# Altium PCB PCB-Powermodule-v11.0.0.PcbDoc (part 4 of 5)
Units mil, origin at the board's own origin, x right, y up, seen from the top; angles counter-clockwise.
Board outline 3031.5 x 1495.87 mil, 4 copper layers (Top Layer, Ground, Power, Bottom Layer), stack 61.653 mil thick; 227 components, 160 nets, 893 pads, 326 vias.
Unrouted connection lines stored in the file: 45.
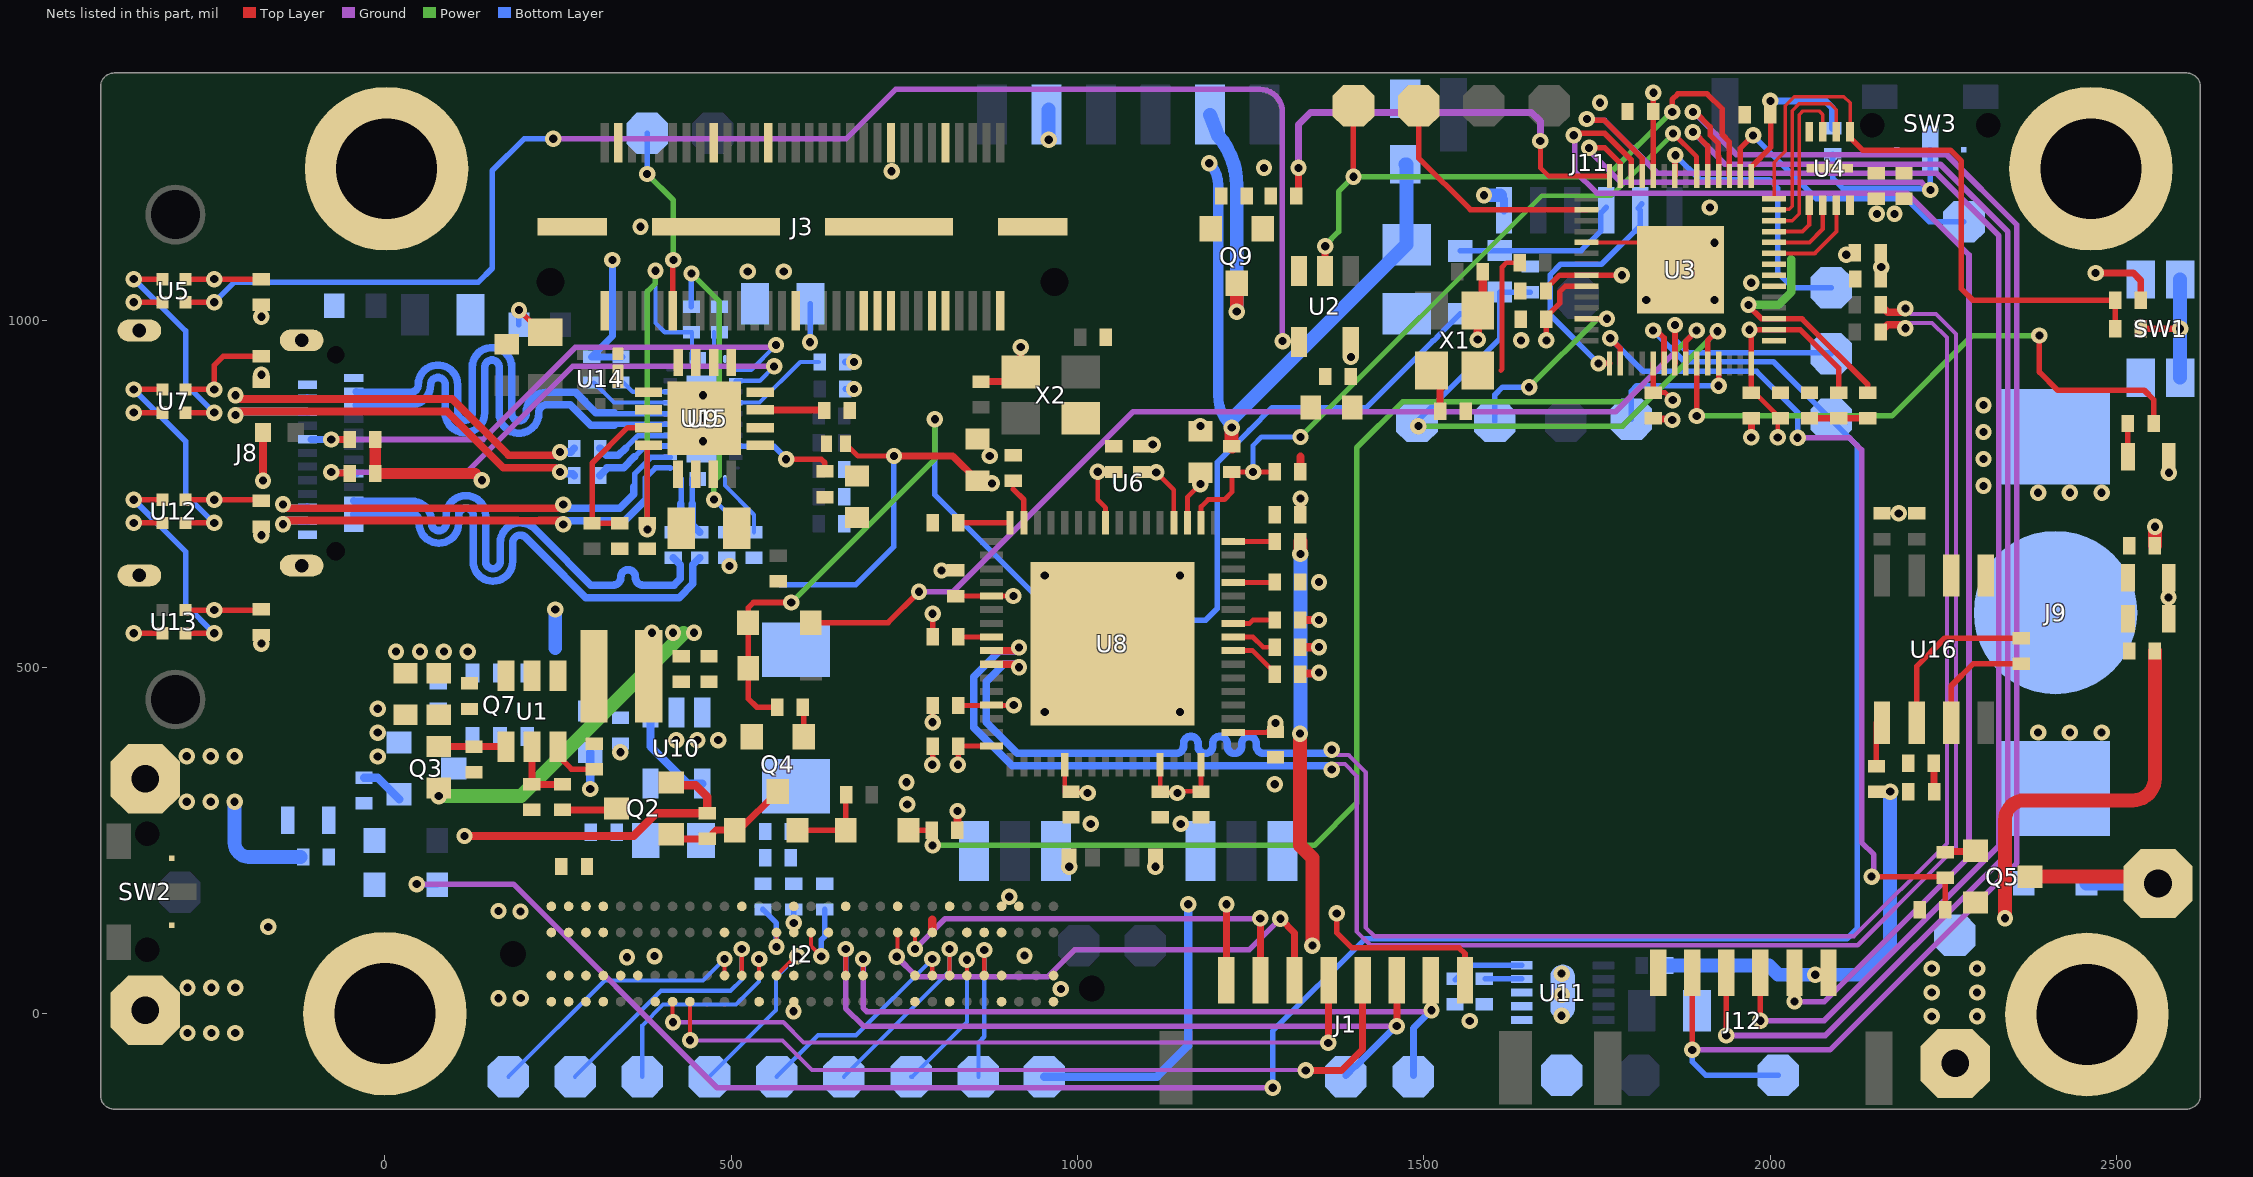
[diagram p4: the nets of this part, all layers, seen from the top]

## Via types
v1: diameter 23.62, hole 11.81, Top Layer to Bottom Layer, tented both sides, 326 vias

## Nets (pads, with @x,y where several pads share a name; then routed paths per layer and width w, separated by ;. In a path a pad name is that pad's centre, name@x,y a point inside that pad or via, vN(x,y) a via of type N, cw(c..) or ccw(c..) an arc to the next point about the centre after c; other vN are vias at no path point) (continued)
+3V3: (continued)
  Power w20: v1(77.66,314.05) 77.66,314.35 196.5,314.35 430.86,548.7 430.86,549.96
  Bottom Layer w8: 570.64,619.36 680,619.36 734.94,674.29 v1(734.94,805.08)
  Bottom Layer w10: v1(2000.27,1317.74) 2080.01,1317.74 2090.08,1307.67 R34.1@2090.08,1277.98
  Bottom Layer w12: U10.1@383.49,434.48 383.49,385.63 437,332.12 U10.4@458.3,332.12 ; P7.1@951.85,-91 1115,-91 1159.77,-46.23 v1(1159.77,157.93)
  Bottom Layer w15: v1(1190.2,1227.78) cw(c1159.65,1197.23) 1202.86,1197.23 1202.86,893.55 ccw(c1269.93,893.55) v1(1222.5,846.12)
  Bottom Layer w20: v1(1222.5,846.12) 1222.5,857.65 C36.2@1475.05,1110.2 1475.05,1226.26 C35.1@1473.1,1226.26 ; R70.1@1851.43,69.45 1998.12,69.45 2011.34,56.24 v1(2065,56.24) 2129.24,56.24 2173.2,100.2 v1(2173.2,320.58)
  other v1: 827.28,359.37 385.44,549.96 415.86,549.96 446.27,549.96 2185.6,722.21 876.3,765.53 2010.89,831.99 1972.7,1055.17 2154.05,1154.65 2179.48,1154.65
+5V: C57.1 C65.2 C67.1 D8.1 J2.A01 J2.A02 J2.B01 J2.B02 J2.C01 J2.C02 J2.D01 J2.D02 P2.1 P14.1 Q7.1 Q7.2 Q7.5 Q7.6 R1.2 R27.2 R28.2 R46.2 R49.1 R52.1 R57.1 R60.1 R61.1 R66.2 R69.1 U9.30 U11.2 U11.3 U15.1 U15.2 U15.3 | length 1638.4
  Top Layer w16: R27.2@-13.97,828.92 R28.2@-13.97,779.7 130.43,779.7 v1(140,770.13)
  Top Layer w20: v1(1321.19,404.32) 1321.19,242.81 1339.03,224.98 v1(1339.03,98.16) ; v1(1321.69,663.59) R52.1@1321.69,681.62 ; v1(2339.07,137.86) 2339.07,279.73 cw(c2367.3,279.73) 2367.3,307.96 2523.46,307.96 ccw(c2523.46,340) 2555.49,340 R1.2@2555.49,523.46
  Bottom Layer w10: v1(328.41,1088.02) 328.41,978.07 R60.1@298.56,948.22 R49.1@340.91,948.22 R49.1@342.58,948.22 ; R57.1@664.8,940.75 v1(677.3,940.75)
  Bottom Layer w20: 245.83,528.14 v1(245.83,583.52) ; v1(1321.19,404.32) 1321.69,404.83 v1(1321.69,663.59)
  other v1: 1566.13,-10.65 2233.15,-3.94 2298.66,-3.94 164,22.15 196.13,22.43 2233.15,30.58 2298.66,30.58 2233.15,65.09 2298.66,65.09 164,148.15 195.72,147.46 523.94,1071.54 575.85,1071.54
+5V_ESC: C3.2 C4.2 C5.2 C13.2 C14.2 C39.1 C40.1 C41.1 C42.1 P1.1 Q2.2 Q7.4 R2.2 R7.2 R11.1 U1.3 U2.5 U5.2 U7.2 U12.2 U13.2 | length 1091.2
  Top Layer w8: U13.2@-287.8,582.68 v1(-246.49,582.68) -184.82,582.68 C42.1@-181.08,586.41 ; U12.2@-287.8,741.93 v1(-246.49,741.93) -179.99,741.93 C41.1@-178.35,740.29 ; U7.2@-287.8,901.18 v1(-246.49,901.18) -246.49,936 -233.49,949 C40.1@-178.35,949 ; U5.2@-287.8,1060.44 v1(-246.49,1060.44) C39.1@-178.35,1060.44
  Top Layer w12: C42.1@-181.08,586.41 C42.1@-180.35,585.68 ; v1(115,256.55) 359.15,256.55 391.97,289.37 R11.1@465.44,289.37 465.44,313.01 448.79,329.66 Q2.2@413.35,329.66
  Bottom Layer w20: v1(-216.98,306) -216.98,246.79 ccw(c-196.43,246.79) -196.43,226.24 R7.2@-121.93,226.24
  other v1: -286,306 -251.49,306 -286,371.51 -251.49,371.51 -216.98,371.51 16.06,522.66 50.58,522.66 85.09,522.66 119.6,522.66 1394.6,948.17
"A8_I2C_2 SDA": J1.4 J2.A08 | length 1078.2
  Top Layer w5: v1@415.28,-11.64 v1(415.97,-12.33)
  Top Layer w6: v1@415.28,-11.64 J2.A08@415.28,17.19
  Top Layer w10: v1@1362.49,-41.75 J1.4@1362.49,47.97
  Ground w6: v1(415.97,-12.33) 575.1,-12.33 604.52,-41.75 v1@1362.49,-41.75
  other v1: 1361.99,-42.25
"A9_I2C_2 SCL": J1.5 J2.A09 | length 1156.8
  Top Layer w6: J2.A09@440.28,17.19 440.43,17.04 440.43,-38.39 v1(440.58,-38.54)
  Top Layer w10: v1(1329.5,-81.95) 1381.19,-81.95 1411.39,-51.75 1411.39,47.65 J1.5@1411.7,47.97
  Ground w6: v1(440.58,-38.54) 440.88,-38.84 573.84,-38.84 616.45,-81.45 v1@1329.5,-81.45
ADC_AVDD: C31.2 R17.1 U3.43
B11_GPIO_155: J2.B11 P19.1 | length 406.1
  Top Layer w6: J2.B11@490.28,54.99 v1(490.28,78.81)
  Bottom Layer w6: P19.1@178.35,-91 317.36,48.01 459.48,48.01 v1(490.28,78.81)
B12_GPIO_154: J2.B12 P27.1 | length 384.4
  Top Layer w6: J2.B12@515.28,54.99 v1(515.28,93.38) v1@515.28,96.38
  Bottom Layer w6: P27.1@274.52,-91 398.52,33 499.15,33 515.28,49.13 v1(515.28,93.38)
B13_GPIO_153: J2.B13 P28.1 | length 325.2
  Top Layer w6: J2.B13@540.28,54.99 v1(540.28,78.81)
  Bottom Layer w6: P28.1@371.62,-91 371.62,-16.96 401.62,13.04 507.04,13.04 540.28,46.28 v1(540.28,78.81)
B14_GPIO_152: J2.B14 P29.1 | length 267.6
  Top Layer w6: J2.B14@565.28,54.99 593.01,82.73 v1(595.23,82.73)
  Bottom Layer w6: P29.1@468.66,-91 564.64,4.98 564.64,52.13 v1(595.23,82.73)
"B18_UART13 RX": J1.6 J2.B18 P34.1 | length 1097.9
  Top Layer w6: J2.B18@665.28,54.99 v1(665.28,93.38)
  Top Layer w10: v1@1459.91,-18.03 1460.91,-17.03 J1.6@1460.91,47.97
  Ground w8: v1(665.28,93.38) 665.28,7.72 691.03,-18.03 v1@1459.91,-18.03
  Bottom Layer w10: P34.1@1387.18,-89.09 1400.47,-75.81 1402.13,-75.81 v1@1459.91,-18.03
  other v1: 1460.91,-18.03
"B19_UART13 TX": J1.7 J2.B19 P35.1 | length 1066.5
  Top Layer w6: J2.B19@690.28,54.99 v1(690.28,78.81)
  Top Layer w10: J1.7@1510.13,47.97 1510.13,5.87 v1(1511,5)
  Ground w8: v1(690.28,78.81) 690.28,8.32 695.81,2.78 1508.78,2.78 v1(1511,5)
  Bottom Layer w10: P35.1@1484.96,-89.09 1484.96,-21.04 v1(1511,5)
B23_MISO: J2.B23 P36.1 | length 318.7
  Top Layer w6: J2.B23@790.28,54.99 v1(790.28,78.81)
  Bottom Layer w6: P36.1@565.71,-91 625.51,-31.2 680.27,-31.2 v1(790.28,78.81)
B24_MOSI: J2.B24 P37.1 | length 285.9
  Top Layer w6: J2.B24@815.28,54.99 v1(815.28,93.38)
  Bottom Layer w6: P37.1@662.75,-91 815.28,61.52 v1(815.28,93.38)
B25_SCLK: J2.B25 P38.1 | length 227
  Top Layer w6: v1@840.17,78.75 840.17,55.1 J2.B25@840.28,54.99
  Bottom Layer w6: P38.1@759.8,-91 761.61,-91 840.28,-12.33 v1(840.28,77.81)
B26_CS_N: J2.B26 P39.1 | length 223.1
  Top Layer w6: J2.B26@865.28,54.99 v1(865.28,91.8)
  Bottom Layer w6: P39.1@856.85,-91 856.85,-41.75 865.28,-33.32 v1(865.28,91.8)
BOOTSEL_MCU: J3.17
C21_GPIO_86: J1.3 J2.C21 | length 734
  Top Layer w6: v1(738.95,82.16) 739.71,82.16 740.28,82.73 J2.C21@740.28,117.19
  Top Layer w10: v1(1292.78,137.12) 1313.28,116.62 J1.3@1313.28,47.97
  Ground w8: v1(738.95,82.16) 767.58,53.53 957.1,53.53 996.12,92.55 1248.21,92.55 v1(1292.78,137.12)
C22_GPIO_85: J1.2 J2.C22 | length 630.2
  Top Layer w6: v1(765.28,93.38) J2.C22@765.28,117.19
  Top Layer w10: v1(1263.71,137.48) 1263.88,137.3 1263.88,48.15 J1.2@1264.06,47.97
  Ground w8: v1(765.28,93.38) 784.51,112.61 809.02,137.12 1263.35,137.12 v1(1263.71,137.48)
CC1: J8.A5 R28.1 U9.2 | length 830.9
  Top Layer w10: v1(-77.42,781.78) -76.38,780.74 -52.01,780.74 R28.1@-50.97,779.7
  Ground w8: v1(-77.42,781.78) 118.35,781.78 271.04,934.47 v1(561.92,934.47)
  Bottom Layer w6: U9.2@506.54,913.66 541.11,913.66 v1(561.92,934.47)
  Bottom Layer w10: v1(-77.42,781.78) -76.51,780.88 -42.47,780.88 J8.A5@-41.29,779.7
CC2: J8.B5 R27.1 U9.1 | length 828.9
  Top Layer w10: v1(-77.34,828.92) R27.1@-50.97,828.92
  Ground w8: v1(-77.34,828.92) 141.91,828.92 275.07,962.08 564.26,962.08 564.67,962.48 v1(564.67,965.42)
  Bottom Layer w6: U9.1@506.54,929.41 528.84,929.41 564.67,965.23 v1(564.67,965.42)
  Bottom Layer w10: J8.B5@-106.41,828.92 v1(-77.34,828.92)
CH_EN: D10.2 J11.4 R36.2 | length 252
  Bottom Layer w8: D10.2@1552.33,1101.7 R36.2@1609.66,1101.7 1727.03,1101.7 1755.5,1130.16 1755.5,1156.21 J11.4@1763.31,1164.02
CH_EN_3V3: D5.1 D7.1 D10.1 R13.2 | length 1843.2
  Top Layer w8: R13.2@566.17,442.44 536.84,442.44 524.34,454.94 D7.1@524.34,564.57 524.34,585.76 532.14,593.57 v1@586.74,593.57
  Power w8: v1(586.74,593.64) 793.97,800.87 v1(793.97,858.1)
  Bottom Layer w8: v1(793.97,858.1) 793.97,749.03 974.74,568.26 1185.1,568.26 1201.69,584.85 1201.69,795.88 1248,842.19 1280.79,874.98 1416.93,874.98 1513.15,971.2 1513.78,971.2 1519.05,976.47 1519.05,977.1 D10.1@1552.33,1010.38
CRX1_N: J8.B10 U9.17 | length 650.5
  Top Layer w11: v1(-147.08,735.23) -141.77,729.92 198.92,729.92 199.2,729.65 252.18,729.65 v1(257.5,734.96)
  Bottom Layer w8: 359.5,760.58 361,762.08 361,779.63 384.41,803.04 411.68,803.04 U9.17@412.06,803.42
  Bottom Layer w11: v1(-147.08,735.23) -141.77,729.92 -112.77,729.92 J8.B10@-111.93,730.76 ; v1(257.5,734.96) 262.81,729.65 312.35,729.65 339.07,729.65 359.5,750.07 359.5,760.58
CRX1_P: J8.B11 U9.16 | length 655.7
  Top Layer w11: v1(-147.08,706.61) -141.77,711.92 191.47,711.92 191.74,711.65 222.7,711.65 222.97,711.92 251.91,711.92 v1(257.5,706.34)
  Bottom Layer w8: 377.5,760.58 376,762.08 376,773.41 390.63,788.04 411.68,788.04 U9.16@412.06,787.67
  Bottom Layer w11: v1(-147.08,706.61) -141.77,711.92 -112.77,711.92 J8.B11@-111.93,711.08 ; v1(257.5,706.34) 262.81,711.65 312.35,711.65 346.52,711.65 377.5,742.62 377.5,760.58
CRX2_N: J8.A10 U9.20 | length 752.7
  Bottom Layer w8: 330.7,849.54 332.2,851.04 411.69,851.04 U9.20@412.06,850.67
  Bottom Layer w11: J8.A10@-41.29,878.13 -40.45,878.97 -17.5,878.97 37.07,878.97 ccw(c37.07,907.97) 66.07,907.97 cw(c76.57,907.97) 87.07,907.97 87.07,867.41 ccw(c115.57,867.41) 144.07,867.41 144.07,933.14 cw(c154.57,933.14) 165.07,933.14 165.07,866.61 ccw(c193.57,866.61) 222.07,866.61 222.07,867.97 cw(c233.07,867.97) 233.07,878.97 247.57,878.97 267.72,878.97 297.15,849.54 330.7,849.54
CRX2_P: J8.A11 U9.21 | length 752.7
  Bottom Layer w8: 330.7,867.54 332.2,866.04 411.69,866.04 U9.21@412.06,866.41
  Bottom Layer w11: J8.A11@-41.29,897.81 -40.45,896.97 -17.5,896.97 37.07,896.97 ccw(c37.07,907.97) 48.07,907.97 cw(c76.57,907.97) 105.07,907.97 105.07,867.41 ccw(c115.57,867.41) 126.07,867.41 126.07,933.14 cw(c154.57,933.14) 183.07,933.14 183.07,866.61 ccw(c193.57,866.61) 204.07,866.61 204.07,867.97 cw(c233.07,867.97) 233.07,896.97 247.57,896.97 275.17,896.97 304.6,867.54 330.7,867.54
CTX1_N: C17.1 J8.A3 | length 769.1
  Bottom Layer w11: J8.A3@-45,740.61 -44.16,739.76 -8.4,739.76 38.42,739.76 cw(c38.42,710.76) 67.42,710.76 67.42,707.86 ccw(c77.92,707.86) 77.92,697.36 ccw(c77.92,707.86) 88.42,707.86 88.42,719.32 cw(c116.92,719.32) 116.92,747.82 cw(c116.92,719.32) 145.42,719.32 145.42,652.92 ccw(c155.92,652.92) 155.92,642.42 ccw(c155.92,652.92) 166.42,652.92 166.42,679.68 cw(c195.42,679.68) 212.9,702.82 213.29,702.82 229.92,686.19 297.4,618.71 324.14,618.71 329.64,618.71 ccw(c329.64,629.71) 340.64,629.71 340.64,630.4 cw(c351.14,630.4) 361.64,630.4 361.64,629.71 ccw(c372.64,629.71) 372.64,618.71 389.16,618.71 417.32,618.71 426.48,627.88 426.48,648.01 C17.1@416.48,658.01
CTX1_P: C9.1 J8.A2 | length 773.7
  Bottom Layer w11: J8.A2@-45,720.92 -44.16,721.76 -8.4,721.76 38.42,721.76 cw(c38.42,710.76) 49.42,710.76 49.42,707.86 ccw(c77.92,707.86) 77.92,679.36 ccw(c77.92,707.86) 106.42,707.86 106.42,719.32 cw(c116.92,719.32) 116.92,729.82 cw(c116.92,719.32) 127.42,719.32 127.42,652.92 ccw(c155.92,652.92) 155.92,624.42 ccw(c155.92,652.92) 184.42,652.92 184.42,679.68 cw(c195.42,679.68) 203.23,687.43 ; 203.24,687.42 229.92,660.74 289.95,600.71 424.77,600.71 444.48,620.42 444.48,648.01 C9.1@454.48,658.01
CTX1C_N: C17.2 U9.15 | length 81.6
  Bottom Layer w8: 426.98,735.85 427.8,736.66 U9.15@427.8,771.92
  Bottom Layer w11: C17.2@416.48,695.01 426.98,705.51 426.98,735.85
CTX1C_P: C9.2 U9.14 | length 81.4
  Bottom Layer w8: U9.14@443.55,771.93 443.55,736.29 443.98,735.85
  Bottom Layer w11: 443.98,735.85 443.98,705.51 C9.2@454.48,695.01
CTX2_N: C8.2 J8.B3 | length 636
  Top Layer w11: v1(-215.67,864.09) -210.36,869.4 89.59,869.4 171.02,787.98 246.92,787.98 v1(252.85,782.05)
  Bottom Layer w11: v1(-215.67,864.09) -210.36,869.4 -112.77,869.4 J8.B3@-111.93,868.56 ; v1(252.85,782.05) 255.26,779.63 270.9,779.63 C8.2@273.56,776.98
CTX2_P: C7.2 J8.B2 | length 635.6
  Top Layer w11: v1(-215.67,892.71) -210.36,887.4 87.88,887.4 97.05,887.4 178.47,805.98 248.01,805.98 v1(252.7,810.67)
  Bottom Layer w11: v1(-215.67,892.71) -210.36,887.4 -112.77,887.4 J8.B2@-111.93,888.24 ; v1(252.7,810.67) 252.85,810.82 268.34,810.82 C7.2@273.56,816.03
CTX2C_N: C8.1 U9.18 | length 120.3
  Bottom Layer w8: 360.27,803.82 376,819.54 411.68,819.54 U9.18@412.06,819.17
  Bottom Layer w11: C8.1@310.56,776.98 321.67,788.1 ; 320.67,788.1 321.67,788.1 ; 360.27,803.82 344.55,788.1 321.67,788.1
CTX2C_P: C7.1 U9.19 | length 118.6
  Bottom Layer w8: 347.54,816.55 365.54,834.54 411.68,834.54 U9.19@412.06,834.92
  Bottom Layer w11: C7.1@310.56,816.03 320.5,806.1 ; C7.1@319.5,806.1 320.5,806.1 ; 347.54,816.55 337.09,806.1 320.5,806.1
D_N: R18.2 U8.10 | length 2812.2
  Top Layer w11: U8.10@875.77,504.45 912.84,504.45 917.31,499.98 v1(915.46,499.98) ; R18.2@2159.33,984.24 2169.83,994.74 2189.84,994.74 v1(2195.16,989.43)
  Ground w6: v1(1367,380.99) 1367,373.18 1391.44,373.18 1416,348.61 1416,124.13 1428.33,111.81 2121.01,111.81 2255,245.8 2255,976 2233.76,997.24 2202.97,997.24 v1(2195.16,989.43)
  Bottom Layer w11: v1(915.46,499.98) 910.15,505.29 894.31,505.29 867.99,478.98 867.99,420.59 912.9,375.68 1112.34,375.68 1142.07,375.68 ccw(c1142.07,386.68) 1153.07,386.68 1153.07,389.71 cw(c1163.57,389.71) 1174.07,389.71 1174.07,386.18 ccw(c1184.57,386.18) 1195.07,386.18 1195.07,389.71 cw(c1205.57,389.71) 1216.07,389.71 1216.07,386.18 ccw(c1226.57,386.18) 1237.07,386.18 1237.07,389.71 cw(c1247.57,389.71) 1258.07,389.71 1258.07,386.68 ccw(c1269.07,386.68) 1269.07,375.68 1295.57,375.68 1348.51,375.68 1361.69,375.68 v1(1367,380.99)
D_P: R20.2 U8.9 | length 2822.3
  Top Layer w11: U8.9@875.77,524.14 912.84,524.14 917.31,528.6 v1(915.46,528.6) ; R20.2@2159.33,1023.24 2169.83,1012.74 2189.84,1012.74 v1(2195.16,1018.05)
  Ground w6: v1(1367,352.37) 1367,360.18 1386.05,360.18 1403,343.23 1403,118.75 1422.94,98.81 1753.83,98.81 2126.39,98.81 2236.96,209.37 2268,240.41 2268,981.38 2239.14,1010.24 2202.97,1010.24 v1(2195.16,1018.05)
  Bottom Layer w11: v1(915.46,528.6) 910.15,523.29 886.85,523.29 849.99,486.43 849.99,413.14 905.45,357.68 1348.51,357.68 1361.69,357.68 v1(1367,352.37)
DIN#: U2.4 U5.4 | length 2142.9
  Top Layer w8: U5.4@-287.8,1026.97 v1(-246.49,1026.97)
  Ground w8: v1(243,1263) 665.94,1263 737.32,1334.37 1263.19,1334.37 cw(c1263.19,1301.78) 1295.79,1301.78 1295.79,971.21 v1(1296,971)
  Bottom Layer w8: v1(-246.49,1026.97) -217.29,1056.17 135,1056.17 155,1076.17 155,1217 201,1263 v1(243,1263)
DOUT1: U5.1 U7.4 | length 323.4
  Top Layer w8: v1(-362.57,1060.44) U5.1@-321.26,1060.44 ; U7.4@-287.8,867.72 v1(-246.49,867.72)
  Bottom Layer w8: v1(-362.57,1060.44) -287.8,985.67 -287.8,909.03 v1(-246.49,867.72)
DOUT2: U7.1 U12.4 | length 323.4
  Top Layer w8: v1(-362.57,901.18) U7.1@-321.26,901.18 ; U12.4@-287.8,708.47 v1(-246.49,708.47)
  Bottom Layer w8: v1(-362.57,901.18) -287.8,826.41 -287.8,749.77 v1(-246.49,708.47)
DOUT3: U12.1 U13.4 | length 323.4
  Top Layer w8: v1(-362.57,741.93) U12.1@-321.26,741.93 ; U13.4@-287.8,549.21 v1(-246.49,549.21)
  Bottom Layer w8: v1(-362.57,741.93) -287.8,667.16 -287.8,590.52 v1(-246.49,549.21)
EN_3V3_BUCK: Q2.3 R5.1 | length 79.1
  Top Layer w10: R5.1@256.27,294.08 332.79,294.08 Q2.3@334.6,292.26
EN_MUX: R58.1 R62.2 U9.12 | length 470.7
  Power w8: v1(442.55,1068.54) 482.92,1028.17 482.92,776.71 475.05,768.84 v1(475.05,742.07)
  Bottom Layer w6: v1(475.05,742.07) 493.48,723.64 R62.2@493.48,695.01 ; U9.12@475.05,771.93 475.05,755.04 475.09,754.99 v1@475.09,750.07
  Bottom Layer w8: R58.1@442.55,1020.81 v1(442.55,1068.54)
EN_VOXL: Q3.3 Q7.3 R2.1
GND: C1.1 C2.2 C3.1 C4.1 C5.1 C6.1 C11.1 C12.1 C13.1 C14.1 C15.1 C16.1 C18.2 C19.1 C20.2 C21.1 C22.2 C23.2 C24.1 C25.2 C26.1 C27.2 C28.2 C29.1 C30.1 C31.1 C32.1 C33.1 C34.2 C35.2 C36.1 C39.2 C40.2 C41.2 C42.2 C43.1 C44.1 C45.2 C46.2 C47.2 C48.2 C49.1 C50.1 C51.1 C52.1 C53.1 C54.1 C55.1 C56.1 C57.2 C58.1 C59.1 C60.1 C61.2 C62.1 C63.1 C64.1 C65.1 C66.1 C67.2 D12.2 D13.2 D15.1 J1.1 J2.A03 J2.A04 J2.A07 J2.A13 J2.A15 J2.A22 J2.A24 J2.A27 J2.A30 J2.B03 J2.B04 J2.B05 J2.B06 J2.B15 J2.B22 J2.B27 J2.B30 J2.C03 J2.C04 J2.C11 J2.C17 J2.C23 J2.C25 J2.C26 J2.C27 J2.D03 J2.D04 J2.D12 J2.D15 J2.D18 J2.D21 J2.D24 J2.D27 J2.D28 J3.01 J3.10 J3.11 J3.18 J3.21 J3.31 J3.36 J3.44 J3.58 J3.59 J3.G1 J3.G2 J3.G3 J3.G4 J4.1 J5.1 J6.1 J7.1 J8.1 J8.2 J8.3 J8.4 J8.A1 J8.A12 J8.B1 J8.B12 J9.2 J11.1 J12.1 LED1.2 LED2.2 LED3.2 LED5.2 P8.1 P31.1 Q3.2 Q4.2 Q5.2 R6.1 R8.1 R9.1 R25.1 R26.1 R30.1 R32.1 R33.1 R37.1 R45.1 R51.1 R53.2 R55.2 R56.2 R59.2 R62.1 R65.2 R68.1 R71.2 R72.2 R73.2 SW1.1 SW2.1 SW2.3 SW3.1 SW3.3 U1.1 U2.3 U3.19 U3.57 U4.4 U4.9 U5.3 U6.5 U6.7 U6.9 U6.10 U6.12 U7.3 U8.65 U9.13 U9.28 U9.31 U10.2 U11.1 U11.11 U12.3 U13.3 U15.5 U15.6 U15.8 U15.9 U15.13 U15.14 U15.17 U16.5 X1.2 X1.4 X2.2 X2.4 | length 1702.3
  Top Layer w5: U8.65@956.68,632.38 956.68,627.68 U8.65@1050.38,533.98 ; U3.57@1819.15,1025.81 1822.09,1025.81 U3.57@1870.33,1074.05
  Top Layer w6: U3.19@1734.98,1113.42 1820.59,1113.42 U3.57@1821.15,1112.85 ; U4.9@2076.22,1223.33 U4.9@2079.13,1220.43
  Top Layer w8: v1(-362.57,549.21) U13.3@-321.26,549.21 ; v1(-362.57,708.47) U12.3@-321.26,708.47 ; v1(-362.57,867.72) U7.3@-321.26,867.72 ; v1(-362.57,1026.97) U5.3@-321.26,1026.97 ; v1(790.28,359.37) 790.79,359.88 C48.2@790.79,386.05 ; v1(790.79,420.59) C52.1@790.79,444.98 ; C53.1@790.79,544.05 v1(790.79,577.27) ; v1(803.49,639.88) C49.1@824.29,639.88 ; v1@1214.85,157.78 v1(1215,157.93)
  Top Layer w10: C44.1@860.63,912.51 903.98,912.51 X2.2@917.98,926.52 v1(918,962.32) ; J1.1@1214.85,47.97 v1@1214.85,157.78 ; C28.2@1523.42,869.7 1523.42,900.49 1524.13,901.2 ; C25.2@1830.96,859.55 1832.16,858.35 1857.27,858.35 v1(1858.47,857.15) ; v1@1972.7,831.99 C23.2@1972.7,859.55 ; C31.1@2056.76,859.55 C30.1@2098.8,859.55 C29.1@2140.83,859.55 ; C22.2@2159.33,1060.74 C20.2@2159.33,1098.73 C20.2@2159.33,1101.73 ; C12.1@2236.39,320.58 C11.1@2236.39,361.46 ; C12.1@2236.51,320.46 2237.15,319.82 C12.1@2237.79,320.46
  Top Layer w12: v1(-178.35,534.18) C42.2@-178.35,546.68 ; v1(-178.35,690.79) C41.2@-178.35,703.29 ; C40.2@-178.35,912 v1@-178.35,924.5 ; v1(-178.35,1006.16) C39.2@-178.35,1023.44 ; v1(-175.95,769.6) D15.1@-175.95,839.09 ; J2.C23@790.28,117.19 790.28,135.54 ; C18.2@826.6,265 v1(826.6,292.48) ; v1(987.88,212.18) D12.2@987.88,225.17 ; C43.1@1040.79,976.7 C43.1@1042.52,974.97 ; v1(1112.34,212.18) D13.2@1112.34,225.17 ; R53.2@1321.79,720.05 v1(1321.79,743.55) ; C6.1@1321.79,782.48 1321.79,803.88 ; R65.2@1323.79,490.05 1324.92,491.18 1347.38,491.18 v1(1348.51,492.31) ; R25.1@1323.87,568.26 v1(1348.51,568.26) ; v1(1577.89,973.13) X1.4@1577.89,1015.37 1585.11,1015.37 C27.2@1585.11,1070.88 ; LED2.2@2575.53,629.32 2575.53,602.47 v1@2577,601 ; v1(2575.53,780.92) LED3.2@2575.53,803.95
  Bottom Layer w8: v1(613.63,969.24) v1@614.3,969.91 ; C57.2@614.3,1024.94 v1@614.3,969.91 ; v1@616.48,974.81 616.48,972.1 v1@614.3,969.91 ; R59.2@664.8,901.85 v1(677.3,901.85)
  Bottom Layer w12: v1(296.35,324.3) C61.2@296.35,377 ; J11.1@1609.86,1181.47 1615.67,1175.66 J11.1@1615.67,1159.82
  Bottom Layer w20: v1(958.36,1261.71) 958.17,1261.9 958.17,1305.06 U6.5@958.36,1305.24 ; v1(1586.89,1181.47) J11.1@1609.86,1181.47
  other v1: -285,-28 -250.49,-28 -215.98,-28 1698.8,-3.07 589.85,3.48 1698.8,27.34 975.97,35.67 -285,37.51 -250.49,37.51 -215.98,37.51 1698.8,57.75 349.5,81.38 389.15,83.05 923.4,83.74 -168.34,125.26 901.4,168.71 1019.07,274 1149,274 1284.56,331.26 -10.37,371.27 340,377.5 420.46,394.91 450.87,394.91 481.28,394.91 -10.37,405.78 952.68,435.58 1148.08,435.58 -10.37,440.3 2575,601 1348.51,623.05 952.68,632.38 1148.08,632.38 497.42,646.23 873.3,805.08 1108.43,821.48 459.3,826.36 1972.56,831.99 1177.37,848.19 459.3,859.82 459.3,892.85 -178.35,922.5 1640.32,972.06 1821.15,1030.24 1919.51,1030.24 2160.33,1077.74 1919.51,1112.85 369,1136 1912.95,1163.81 731.54,1216.21 1269.17,1221 1754.24,1315.1
GPIO0: P11.1 U3.2 | length 422.2
  Top Layer w8: U3.2@1956.95,1209.4 1957.01,1209.46 1957.01,1249.65 v1(1975.28,1267.93)
  Bottom Layer w8: v1(1975.28,1267.93) 2066.43,1176.78 2196.17,1176.78 2229.69,1143.26 P11.1@2279.74,1143.26
GPIO1: P10.1 U2.2 U3.3 | length 957.5
  Top Layer w8: v1(1398.35,1208.34) P10.1@1398.35,1310.5 ; v1@1858.52,1302.46 1858.4,1302.58 1858.4,1319.55 1866.85,1328 1908.77,1328 1930.96,1305.81 1930.96,1268.9 1941.2,1258.66 U3.3@1941.2,1209.4
  Top Layer w10: U2.2@1357.19,1072.18 1357.4,1072.38 1357.4,1107.81 v1(1357.6,1108.01)
  Power w8: v1(1357.6,1108.01) 1357.6,1109.92 1376.76,1129.09 1376.76,1186.75 v1(1398.35,1208.34) 1764.04,1208.34 v1@1858.34,1302.64
  other v1: 1858.52,1301.76
GPIO2: J12.2 P12.1 U3.4 | length 2407.2
  Top Layer w8: v1(1887.34,-52.34) J12.2@1887.34,58.94 ; v1(1888.31,1301.76) 1891.77,1301.76 1913.21,1280.32 1913.21,1268.26 1925.2,1256.27 1925.2,1237.72 1925.39,1237.52 1925.39,1209.46 U3.4@1925.45,1209.4
  Ground w8: v1(1887.34,-52.34) 2086.04,-52.34 2356,217.62 2356,405.23 ; v1(1888.31,1301.76) 1889.4,1301.76 1951.1,1240.06 2254.84,1240.06 2356.01,1138.89 2356.01,405.25
  Bottom Layer w8: v1(1887.34,-52.34) 1887.34,-69.34 1907.09,-89.09 P12.1@2011.34,-89.09
GPIO3: J12.3 U3.5 | length 2090.2
  Top Layer w8: v1(1888.31,1272.66) 1889.78,1272.66 1909.7,1252.73 U3.5@1909.7,1209.4 ; v1(1936.56,-31.53) J12.3@1936.56,58.94
  Ground w8: v1(1888.31,1272.66) 1934.63,1226.33 2245.5,1226.33 2343,1128.83 2343,232 2079.44,-31.56 v1(1936.56,-31.53)
GPIO6: P9.1 U3.8 | length 405.6
  Top Layer w8: U3.8@1862.46,1209.4 1862.52,1209.46 1862.52,1238.65 v1(1863.05,1239.17)
  Bottom Layer w8: v1(1863.05,1239.17) 1898.23,1203.98 1998.69,1203.98 2011.18,1191.49 2011.18,1069.43 2032.49,1048.12 P9.1@2088.01,1048.12
GPIO8_TX1: J12.4 U3.11 | length 2192.6
  Top Layer w8: v1(1735.32,1291.58) 1736.9,1290 1760.32,1290 1815.22,1235.11 U3.11@1815.22,1209.4 ; v1(1985.77,-10.23) J12.4@1985.77,58.94
  Ground w8: v1(1735.32,1291.58) 1737.35,1289.56 1760.77,1289.56 1836.99,1213.33 2240.11,1213.33 2330,1123.45 2330,242 2077.77,-10.23 v1(1985.77,-10.23)
GPIO9_RX1: J12.5 U3.12 | length 2045.3
  Top Layer w8: v1(1716.4,1268.07) 1719.1,1270.77 1761.17,1270.77 1799.4,1232.53 1799.4,1209.46 U3.12@1799.47,1209.4 ; v1(2034.98,17.62) J12.5@2034.98,58.94
  Ground w8: v1(1716.4,1268.07) 1717.75,1266.71 1717.75,1216.78 1749.92,1184.62 2197.78,1184.62 2287,1095.4 2287,226.04 2077.96,17 v1@2033.45,17
GPIO10: R34.2 SW3.2 U3.13 | length 830.2
  Top Layer w8: v1(1738.57,1249.96) 1761.3,1249.96 1783.66,1227.61 1783.66,1209.46 U3.13@1783.72,1209.4
  Ground w8: v1(1738.57,1249.96) 1738.57,1245.85 1784.41,1200 2218.72,1200 2229.7,1189.03 v1(2231.22,1189.03)
  Bottom Layer w8: R34.2@2090.08,1240.98 2090.08,1206.21 2105,1191.29 2228.96,1191.29 v1(2231.22,1189.03) ; v1@2231.22,1192.72 SW3.2@2231.22,1246.97
GPIO11: R43.2 U3.14 | length 637.8
  Top Layer w7: R43.2@1316.05,1180.37 ccw(c1308.81,1187.62) R43.2@1319.05,1187.62 ; v1(1668.13,1259.96) 1668.13,1221 1679.72,1209.4 U3.14@1767.97,1209.4
  Top Layer w10: R43.2@1319.05,1187.62 v1(1319.05,1221)
  Ground w10: v1(1319.05,1221) 1319.05,1283.95 1336.21,1301.11 1655.37,1301.11 1668.13,1288.35 v1(1668.13,1259.96)
GPIO18: J11.5 U3.29 | length 362.5
  Top Layer w8: v1(1752.14,938.69) U3.29@1767.97,938.69
  Bottom Layer w8: v1(1752.14,938.69) 1682.5,1008.34 1682.5,1066.93 1697.49,1081.92 1756.28,1081.92 1812.52,1138.16 J11.5@1812.52,1159.82 ; J11.5@1809.2,1162.55 J11.5@1814.52,1169.02
GPIO19: R29.2 R30.2 U3.30 | length 1271.5
  Top Layer w8: v1(1769.14,974.99) 1783.72,960.42 U3.30@1783.72,938.69 ; v1(2146.39,197.9) 2251.35,197.9 R29.2@2252.92,196.33 R30.2@2252.92,150.08
  Ground w8: v1(2039.51,831.39) 2114.46,831.39 2132,813.85 2132,247.1 2149.58,229.52 2149.58,221.31 2149.38,221.11 2149.38,200.89 v1(2146.39,197.9)
  Bottom Layer w8: v1(1769.14,974.99) 1816.75,927.39 1980.39,927.39 2039.51,868.27 v1(2039.51,831.39)
GPIO22: D6.2 P22.1 U3.34 | length 3493.9
  Top Layer w8: v1@1830.96,991.37 1846.65,975.68 1846.65,938.76 U3.34@1846.71,938.69
  Ground w8: v1@46.5,187 185.61,187 479.61,-107 v1(1281.75,-107)
  Bottom Layer w8: v1(46,187) 47,186 D6.2@75.55,186 ; v1(1281.75,-107) 1281.75,-25.09 1414.83,108 2110.47,108 2125.58,123.11 2125.58,820.27 P22.1@2088.01,857.84 2004.67,941.18 1876.06,941.18 v1(1830.96,986.28)
GPIO23: D7.2 P21.1 U3.35 | length 1759.1
  Top Layer w8: D7.2@614.89,564.57 726.46,564.57 v1(771,609.11) ; U3.35@1862.46,938.69 1862.52,938.76 v1(1862.52,994.24)
  Ground w8: v1(771,609.11) 820.16,609.11 1080.05,869 1776.42,869 1862.52,955.1 v1(1862.52,994.24)
  Bottom Layer w8: v1(1862.52,994.24) 1862.52,973.11 1881.45,954.18 2086.81,954.18 P21.1@2088.01,952.98
GPIO24: C18.1 D2.2 U3.36 | length 1821.8
  Top Layer w8: D2.2@755.83,264.86 789.45,264.86 C18.1@789.6,265 789.6,244.07 v1(790.79,242.88) ; U3.36@1878.21,938.69 1878.21,970.78 v1(1893.7,986.28)
  Power w8: v1(790.79,242.88) 1341.96,242.88 1403,303.92 1403,817 1469.6,883.6 1791.02,883.6 v1(1893.7,986.28)
GPIO25: R16.2 U3.37 | length 887.1
  Top Layer w8: v1(1893.96,862.89) U3.37@1893.96,938.69 ; v1(2388.66,979) 2388.66,926.34 2415,900 2540,900 2553.48,886.52 R16.2@2553.48,852
  Power w8: v1(1893.96,862.89) 2175.58,862.89 2291.69,979 v1(2388.66,979)
GPIO26_ADC0: P16.1 R36.1 R37.2 U3.38 | length 828.1
  Top Layer w8: U3.38@1909.7,938.69 1909.77,938.76 1909.77,971.75 1923.35,985.33 v1(1924.09,985.33)
  Power w8: v1(1492,848.19) 1786.94,848.19 v1(1924.09,985.33)
  Bottom Layer w8: v1(1492,848.19) 1492,856.95 1609.66,974.6 R36.1@1609.66,1041.7 R37.2@1653.6,1041.7
GPIO27_ADC1: P17.1 U3.39 | length 206.8
  Top Layer w8: v1@1925.45,901.48 1925.45,908.48 U3.39@1925.45,938.69
  Bottom Layer w8: P17.1@1799.47,858.41 1799.47,898.8 1807.25,906.58 v1(1925.45,906.58)
GRST: C6.2 R35.1 U3.6 U8.50 | length 1075.2
  Top Layer w7: U8.50@1178.33,708.58 1178.33,732.01 1188.53,742.2 1212.12,742.2 1222.79,752.88 R35.1@1222.79,781.98 v1(1253.49,781.98) 1284.19,781.98 C6.2@1284.69,782.48 ; v1(1859.75,1270.73) 1860.21,1270.73 1893.82,1237.13 1893.82,1209.54 U3.6@1893.96,1209.4
  Power w7: v1(1321.79,832.5) 1670.2,1180.91 1770.58,1180.91 1859.75,1270.07 v1(1859.75,1270.73)
  Bottom Layer w7: v1(1253.49,781.98) 1253.49,820.49 1265.5,832.5 v1(1321.79,832.5)
NetC10_1: C10.1 L2.1 U1.2
NetC10_2: C10.2 U1.6 | length 73.6
  Top Layer w8: U1.6@249.83,385.6 249.83,372.2 269.11,352.91 C10.2@302.02,352.91
NetC28_1: C28.1 R19.2 X1.3 | length 178.2
  Top Layer w7: 1610.89,928.4 1612.89,930.4 1612.89,1077.98 1618.92,1084.02 R19.2@1638.16,1084.02
NetC58_2: C58.2 C59.2 FB1.2 U9.8 | length 151.9
  Top Layer w8: v1(579.26,800.35) 630.23,800.35 635.24,795.34 C58.2@635.24,782.84
  Bottom Layer w8: U9.8@506.54,819.17 561.92,819.17 579.26,801.83 v1(579.26,800.35)
NetD2_1: D2.1 D3.1 R31.2 | length 121.3
  Top Layer w8: D3.1@595.51,264.86 D2.1@665.28,264.86 665.28,315.52 R31.2@665.93,316.17
NetD3_2: D3.2 Q2.1 Q4.3 R11.2 | length 183.3
  Top Layer w10: Q2.1@413.35,254.86 415.83,252.37 R11.2@465.44,252.37 477.92,264.86 D3.2@504.96,264.86 511.09,264.86 Q4.3@567.23,321
NetD4_1: D4.1 D6.1 R12.1
NetD8_2: D8.2 P13.1 Q5.3 | length 288.6
  Top Layer w20: Q5.3@2374.9,197.9 2375,198 P13.1@2560,198
  Bottom Layer w20: D8.2@2456.58,188 P13.1@2560,188
NetJ2_C14: J2.C14 R9.2 | length 82.9
  Top Layer w6: v1(565.28,96.38) J2.C14@565.28,117.19
  Bottom Layer w8: R9.2@545.76,150.36 565.28,130.84 v1(565.28,96.38)
NetJ2_C15: J2.C15 R32.2 | length 33.2
  Top Layer w6: J2.C15@590.28,117.19 v1(590.28,131)
  Bottom Layer w8: v1(590.28,131) R32.2@590.28,150.36
NetJ2_C16: J2.C16 R33.2 | length 117.2
  Top Layer w6: J2.C16@615.28,117.19 615.28,97.4 v1(629.96,82.73) v1@634.89,77.79
  Bottom Layer w8: v1(629.96,82.73) 629.96,106.48 634.81,111.33 R33.2@634.81,150.36
NetJ3_49: J3.49 P30.1 | length 272.3
  Top Layer w8: J3.49@415.77,1014.6 415.77,1087.34 v1(416.46,1088.02)
  Power w8: v1(378.57,1212.23) 416.46,1174.35 v1(416.46,1088.02)
  Bottom Layer w8: v1(378.57,1212.23) 378.57,1215.43 P30.1@378.57,1270.88
NetJ9_1: J9.1 U16.6
  other v1: 2386.82,406 2432.66,406 2478.49,406 2386.82,752 2432.66,752 2478.49,752 2308,762 2308,800.85 2308,839.69 2308,878.54
NetL1_1: L1.1 U10.3
NetLED1_1: LED1.1 R1.1
NetLED2_1: LED2.1 R4.1
NetLED3_1: LED3.1 R16.1 | length 48.1
  Top Layer w8: LED3.1@2516.48,803.95 R16.1@2516.48,852
NetLED5_1: LED5.1 R7.1
NetQ3_1: Q3.1 R12.2 | length 63.7
  Bottom Layer w12: R12.2@-30.23,340.6 -10.37,340.6 Q3.1@20.63,309.6
NetQ4_1: Q4.1 R13.1 | length 43.3
  Top Layer w8: R13.1@603.17,442.44 604.64,440.98 Q4.1@604.64,399.74
NetQ5_1: Q5.1 R29.1 | length 43.2
  Top Layer w10: R29.1@2252.92,234.3 Q5.1@2296.16,234.3
NetQ9_1: Q9.1 R10.1 R43.1
NetQ9_3: Q9.3 U6.2 | length 334.1
  Top Layer w20: v1(1229.78,1013.48) Q9.3@1229.79,1054.47
  Bottom Layer w20: U6.2@1191.2,1297.87 1202.86,1267.87 cw(c1118.63,1195.35) 1229.78,1195.35 1229.78,1195.28 v1(1229.78,1013.48)
NetR3_1: R3.1 R6.2 U1.4 | length 97.4
  Top Layer w10: R3.1@77.66,385.58 U1.4@175.03,385.6
NetR5_2: R5.2 R8.2 U1.5 | length 98.9
  Top Layer w10: U1.5@212.43,385.6 212.43,331.43 R8.2@212.07,331.08 R5.2@256.27,331.08
NetR22_1: R22.1 SW1.2 | length 198.5
  Top Layer w10: R22.1@2534.98,988.83 v1(2591.79,988.83)
  Bottom Layer w20: SW1.2@2591.79,917.96 v1(2591.79,988.83) SW1.2@2591.79,1059.7
NetR23_1: R23.1 U16.1 | length 63
  Top Layer w8: R23.1@2153.39,357.1 U16.1@2153.39,420.08
NetR24_1: R24.1 U16.3 | length 167.3
  Top Layer w8: U16.3@2261.39,420.08 2261.39,473.43 2292.92,504.96 2303.92,504.96 R24.1@2362.23,504.96
NetR25_2: R25.2 U8.42 | length 63.9
  Top Layer w7: U8.42@1224.99,563.51 1248.42,563.51 1253.18,568.26 R25.2@1286.87,568.26
NetR26_2: R26.2 U8.45 | length 62
  Top Layer w7: U8.45@1224.99,622.56 1286.3,622.56 R26.2@1286.79,623.05
NetR45_2: R45.2 U8.64 | length 79.9
  Top Layer w8: R45.2@822.88,708.58 U8.64@902.74,708.58
NetR49_2: R49.2 U9.23 | length 76.7
  Bottom Layer w6: R49.2@340.91,911.22 344.41,911.22 357.72,897.91 U9.23@412.06,897.91
NetR50_1: R50.1 U9.11 | length 94.3
  Bottom Layer w6: U9.11@490.8,771.93 490.8,762.27 532.8,720.27 R50.1@532.8,695.01
NetR51_2: R51.2 R67.1 U10.5
NetR52_2: R52.2 R53.1 U8.48 | length 59.7
  Top Layer w7: U8.48@1224.99,681.62 R52.2@1284.69,681.62
NetR54_1: R54.1 U8.41 | length 67.9
  Top Layer w7: U8.41@1224.99,543.82 1253.18,543.82 1267.95,529.05 R54.1@1286.79,529.05
NetR56_1: R56.1 U9.29 | length 38.8
  Bottom Layer w6: U9.29@475.05,945.15 R56.1@475.05,983.9
NetR57_2: R57.2 U9.4 | length 144
  Bottom Layer w6: U9.4@506.54,882.16 541.05,882.16 599.63,940.75 R57.2@626.24,940.75
NetR60_2: R60.2 U9.22 | length 122.5
  Bottom Layer w6: R60.2@301.56,911.22 330.62,882.16 U9.22@412.06,882.16
NetR61_2: R61.2 R74.1 U15.15 | length 229.2
  Top Layer w8: R61.2@339,708.01 R74.1@299.07,708.01 299.07,794.61 350.45,845.99 U15.15@380.44,845.99
NetR63_1: R63.1 R64.2 | length 72.4
  Top Layer w8: v1(193.55,1015.71) 225.7,983.56 R64.2@231.52,983.56
  Bottom Layer w8: R63.1@193.55,994.56 v1(193.55,1015.71)
NetR65_1: R65.1 U8.40 | length 75.9
  Top Layer w7: U8.40@1224.99,524.14 1252.71,524.14 R65.1@1286.79,490.05
NetR68_2: R68.2 U15.7 | length 93.3
  Top Layer w10: U15.7@541.86,871.59 634.4,871.59 R68.2@634.4,870.86
NetR69_2: R69.2 U11.5 | length 105
  Bottom Layer w8: R69.2@1545.04,48.67 1566.13,69.76 U11.5@1641.29,69.76
NetU14_4: U14.4 U14.7 U15.10 U15.11 U15.12
PWRCTL_USBC_EN: R66.1 U11.4 | length 52.8
  Bottom Layer w8: R66.1@1588.44,50.07 U11.4@1641.29,50.07
QSPI_SD0: U3.53 U4.5 | length 83.2
  Top Layer w6: U3.53@2005.69,1129.17 2046.65,1129.17 2056.26,1138.78 U4.5@2056.22,1167.37
QSPI_SD1: U3.55 U4.2 | length 269.3
  Top Layer w5: U3.55@2005.69,1160.66 2006.12,1161.1 2027.29,1161.1 2031.73,1165.54 2031.73,1303.82 2041.54,1313.62 2086.96,1313.62 2095.59,1304.98 U4.2@2095.59,1273.48
QSPI_SD2: U3.54 U4.3 | length 246.4
  Top Layer w5: U3.54@2005.69,1144.91 2032.08,1144.91 2041.97,1154.8 2041.97,1297.98 2047.19,1303.2 2070.85,1303.2 2075.91,1298.14 U4.3@2075.91,1273.48
QSPI_SD3: U3.51 U4.7 | length 141.2
  Top Layer w6: U3.51@2005.69,1097.67 2064.2,1097.67 2095.59,1129.06 U4.7@2095.59,1167.37
QSPI_SLCK: U3.52 U4.6 | length 112.8
  Top Layer w6: U3.52@2005.69,1113.42 2056.55,1113.42 2075.91,1132.77 U4.6@2075.91,1167.37
QSPI_SS: R21.1 R22.2 U3.56 U4.1 | length 923
  Top Layer w5: U3.56@2005.69,1176.41 2005.69,1229.18 2021.73,1245.22 2021.73,1310.92 2034.85,1324.04 2106.07,1324.04 2115.28,1314.83 U4.1@2115.28,1273.48
  Top Layer w8: U4.1@2115.28,1273.48 2115.28,1264.99 2133.47,1246.81 2260,1246.81 2276,1230.81 2276,1046.49 2292.49,1030 R21.1@2497.98,1030 R22.2@2497.98,988.83
RESET_MCU: J3.09
RESET_USB_HUB: J3.19
RUN: P26.1 U3.26 | length 280
  Top Layer w5: U3.26@1734.98,1003.18 1734.98,1002.74 U3.26@1735.42,1003.18
  Top Layer w8: U3.26@1735.42,1003.18 v1(1764.17,1003.18)
  Power w8: v1(1651.93,904.41) 1750.7,1003.18 v1(1764.17,1003.18)
  Bottom Layer w8: P26.1@1602.58,855 1602.58,893.48 1613.51,904.41 v1(1651.93,904.41) v1@1648.58,907.75
SBUS_TX: P45.1 U3.16 | length 348.6
  Top Layer w8: P45.1@1492.49,1310.5 1492.49,1235.23 1567.06,1160.66 U3.16@1734.98,1160.66